# Altium PCB PCB1.PcbDoc
Units mm, origin at the board's own origin, x right, y up, seen from the top; angles counter-clockwise.
Board outline 46.79 x 22.48 mm, 2 copper layers (Top Layer, Bottom Layer); 5 components, 4 nets, 22 pads, 8 vias.
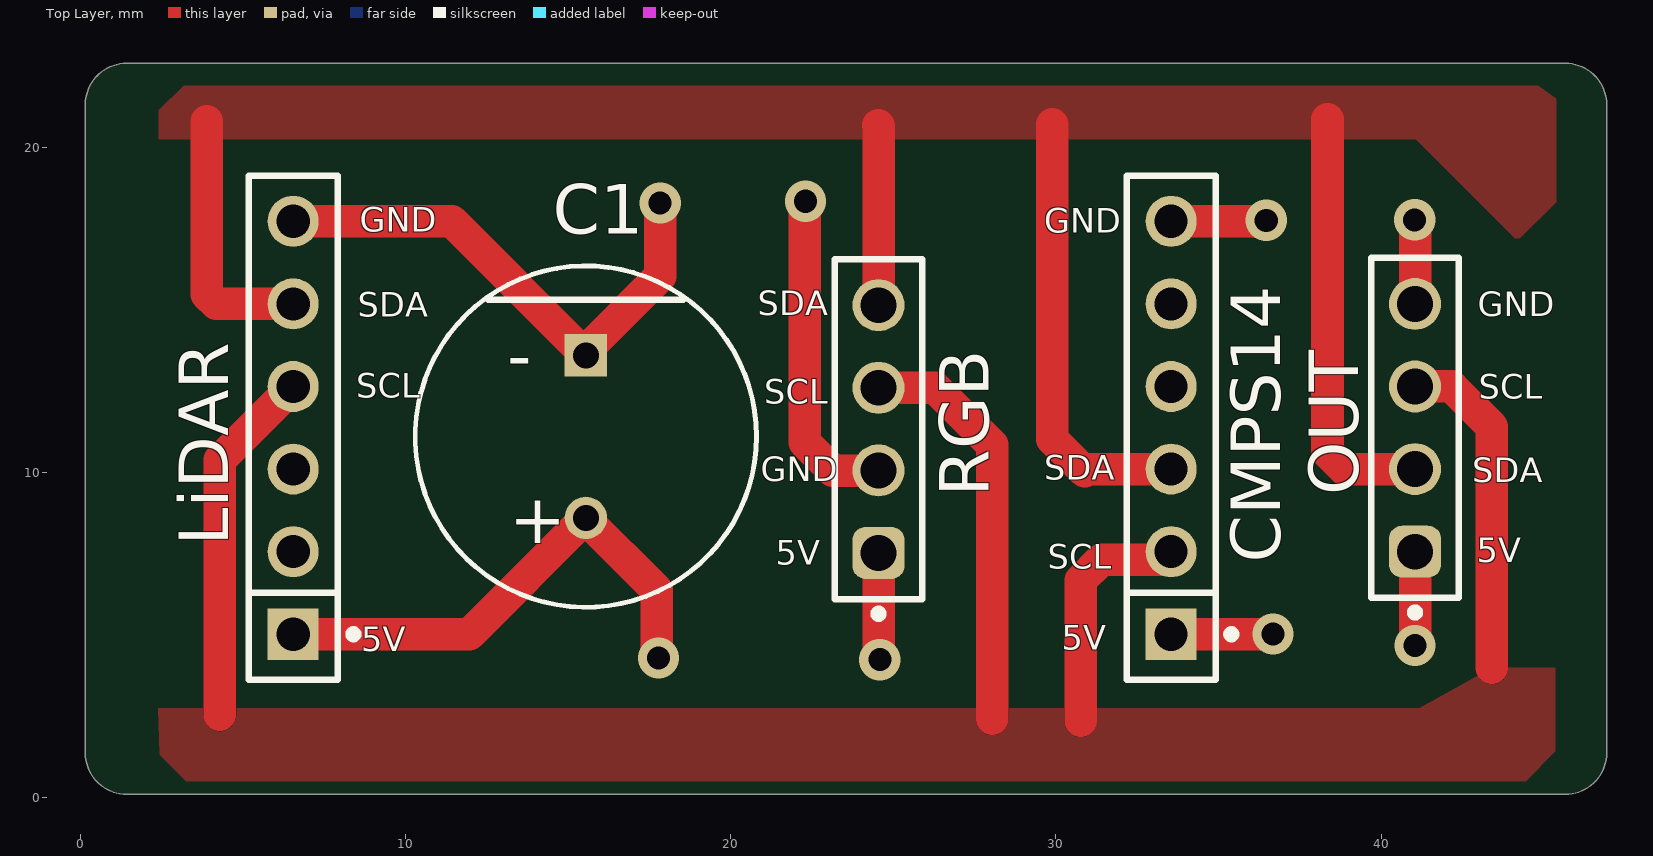
[diagram p0: Top Layer view]
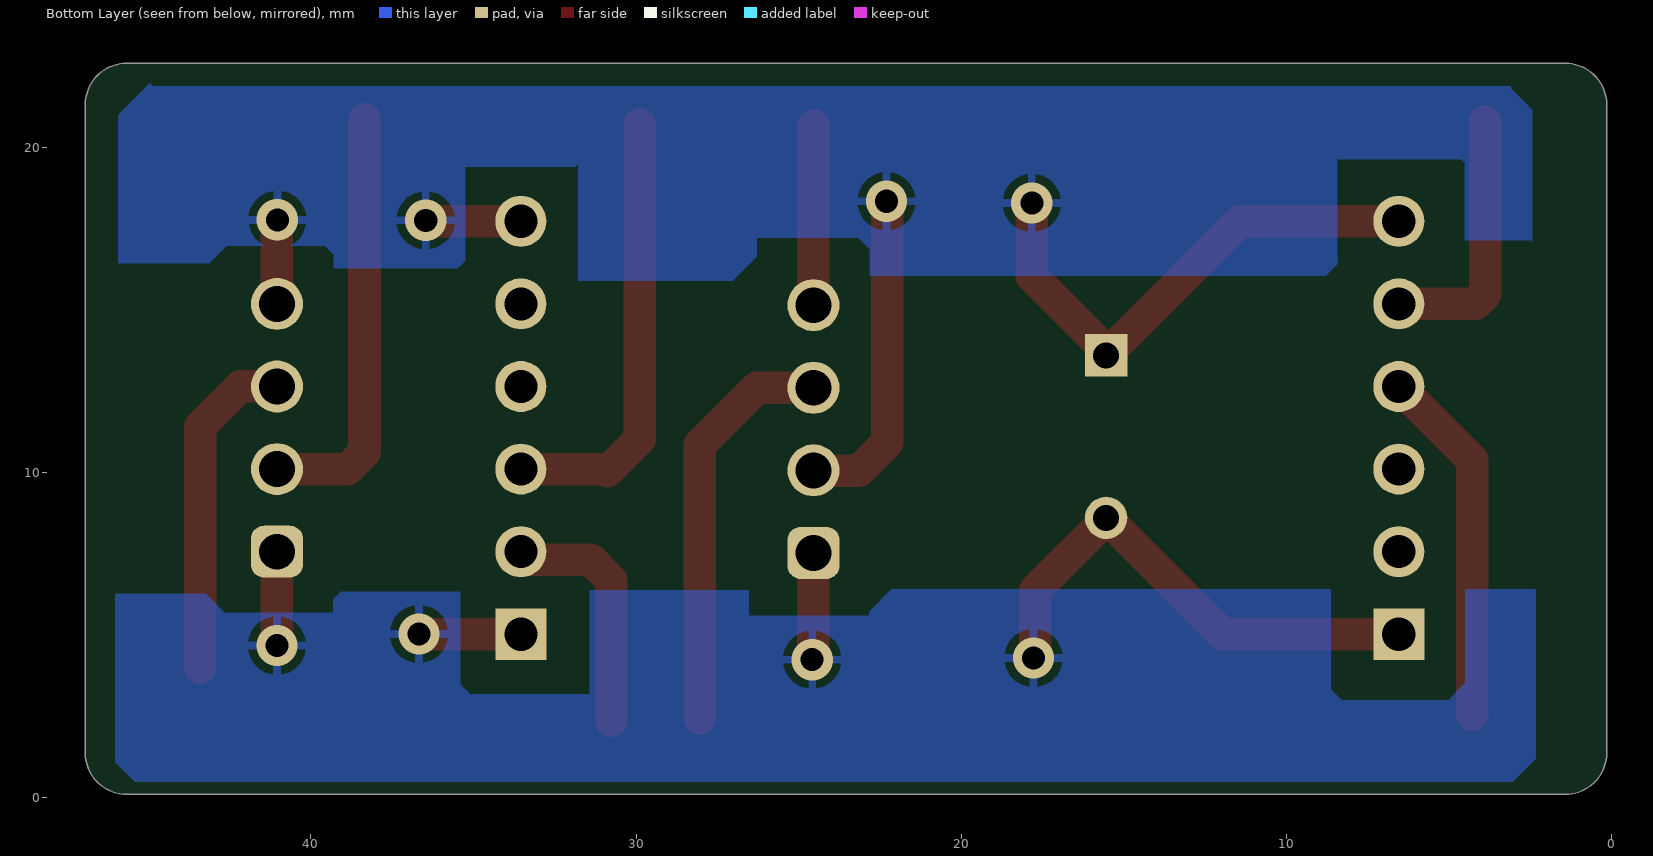
[diagram p1: Bottom Layer view, seen from below]

## Layer stack, top to bottom
Top Solder: solder mask 0.0102, Solder Resist, Dk 3.5
Top Layer: signal copper 0.0356
Dielectric 1: dielectric 0.32, FR-4, Dk 4.8
Bottom Layer: signal copper 0.0356
Bottom Solder: solder mask 0.0102, Solder Resist, Dk 3.5

## Board outline
0.152,1.372 0.152,21.311 cw(c1.422,21.311) 1.422,22.581 45.669,22.581 cw(c45.669,21.311) 46.939,21.311 46.939,1.372 cw(c45.669,1.372) 45.669,0.102 1.422,0.102 cw(c1.422,1.372)

## Design rules (kind name [scope] priority, off if disabled: settings)
Clearance [All] p1 off: gap=0.006 ignorepadtopadclearanceinfootprint=FALSE except(0: Arc-SMDPad Arc-THPad Arc-Hole Track-SMDPad Track-THPad Track-Hole SMDPad-SMDPad SMDPad-THPad SMDPad-Hole THPad-THPad THPad-Hole Via-Hole Fill-Hole Poly-Hole Region-Hole Text-Hole)
PolygonConnect [All] p1: connectstyle=Relief reliefconductorwidth=0.254 reliefentries=4 polygonreliefangle="90 Angle" airgapwidth=0.254
RoutingVias [All] p1: holewidth=0.711 width=1.27 viastyle="Through Hole" minholewidth=0.711 minwidth=1.27 maxholewidth=0.711 maxwidth=1.27
SolderMaskExpansion [All] p1: expansion=0.102 istentingtop=FALSE
SupplyNets "Schematic Supply Nets_1" [InNet('GND')] p1: voltage=0.000
SupplyNets "Schematic Supply Nets" [InNet('+5')] p2: voltage=0.000
Width [All] p1: maxlimit=1 minlimit=0.006 preferedwidth=0.008
30 further rules are at their usual default settings.

## Components (designator, comment, footprint, x,y, rotation, side; value= is the part's Value field where it differs from the comment)
C1 "1000uF" FP-RAD-TH-D_10_0_5-L_16_1-MFG 15.546,11.103 r270 top
CMPS14 "22-28-4060" FP-22-28-4060-MFG 33.546,11.373 r90 top
LiDAR "22-28-4060" FP-22-28-4060-MFG 6.546,11.373 r90 top
OUT "61300411121" 61300411121 41.046,11.373 r90 top
RGB "61300411121" 61300411121 24.546,11.333 r90 top

## Footprints (in the part's own frame and the unit in brackets; to place one, negate y for a bottom-side part, rotate by r counter-clockwise, add the part's x,y. Pads: shape width x height; smd on the part's side, far side on the other; paste and mask are expansions set on the pad)
61300411121 [mm] "Pin Header, pitch 2.54 mm, THT, Vertical, single row, 4p"
  rrect50% 1.6x1.6 hole 1.1: 1(-3.81,0)
  round 1.6 hole 1.1: 2(-1.27,0) 3(1.27,0) 4(3.81,0)
  silkscreen extent -5.8,-1.35 5.23,1.35, body extent -5.08,-1.27 5.08,1.27, height 8.57
FP-22-28-4060-MFG [mm]
  rect 1.57x1.57 hole 1.02 paste-2539.97 mask+0: 1(-6.35,0)
  round 1.57 hole 1.02 paste-2539.97 mask+0: 2(-3.81,0) 3(-1.27,0) 4(1.27,0) 5(3.81,0) 6(6.35,0)
  silkscreen extent -7.75,-1.97 7.75,1.37, body extent -7.85,-1.47 7.85,1.47, height 0.25
FP-RAD-TH-D_10_0_5-L_16_1-MFG [mm]
  rect 1.3x1.3 hole 0.8 paste-2539.97 mask+0: 1(-2.5,0)
  round 1.3 hole 0.8 paste-2539.97 mask+0: 2(2.5,0)
  silkscreen extent -5.25,-5.25 5.25,5.25, body extent -5.35,-5.35 5.35,5.35, height 0.25

## Part data
C1: library part CMP-05427-001524-1, "Aluminum Electrolytic Capacitors (Radial Lead Type) 1000uF ±20% 16V", Capacitance=1mF, Case/Package=Radial, Leakage Current=3uA, Max Operating Temperature=85°C, Min Operating Temperature=-40°C, Package Quantity=200, Ripple Current=680mA, Tolerance=20%, Voltage=16V, Construction=RADIAL, Contact Plating=Tin, Diameter=10mm, Dissipation Factor=0.2%, Height=16mm, Height - Seated (Max)=0.669inch, Lead Diameter=0.6mm, Lead Pitch=5mm, Lead/Base Style=Straight, Length=16mm, Life (Hours)=2000Hour, Mount="Through Hole", Number of Pins=2, Packaging=Bulk, Polarity=Polar, Radiation Hardening=No, REACH SVHC="No SVHC", Ripple Current (AC)=680mA, RoHS Compliant=Yes, Series=M, Size=16mm, Termination=Radial, Voltage Rating=16V, Voltage Rating (DC)=16V, Width=0inch
CMPS14 LiDAR: library part CMP-04776-000763-1, "CONN HEADER VERT 6POS 2.54MM", Color=Black, Contact Resistance=20mR, Current Rating=4A, Max Operating Temperature=75°C, Max Voltage Rating (AC)=250V, Max Voltage Rating (DC)=250.25kV, Min Operating Temperature=0°C, Package Quantity=1, Connector Type="Male Pin", Contact Material=Brass, Contact Mating Length=0.24inch, Contact Plating=Tin, Contact Type="Male Pin", Depth=2.49mm, Gender=Male, Housing Color=Black, Housing Material=Thermoplastic, Length=15.24mm, Mount="Through Hole", Number of Contacts=6, Number of Positions=6, Number of Rows=1, Orientation=Straight, Packaging=Bulk, Pitch=2.54mm, RoHS Compliant=Yes, Series="KK® 42375", Termination=Solder, Voltage Rating=250V
OUT RGB: library part CMP-1502-01064-3, Color=Black, Contact Resistance=20mΩ, Current Rating=3A, Max Operating Temperature=105°C, Min Operating Temperature=-40°C, Operating Supply Voltage=250V, Connector Type="Male Pin", Contact Material=Copper, Contact Mating Length=5.9944mm, Contact Plating=Gold, Gender=Male, Height=8.89mm, Lead Free="Lead Free", Lead Pitch=2.54mm, Mount="Through Hole", NexarPartId=32855522, Number of Contacts=4, Number of Pins=4, Number of Positions=4, Number of Rows=1, Orientation=Vertical, Packaging=Bulk, Pitch=2.54mm, REACH SVHC=Unknown, RoHS=Compliant, Termination=Solder, Voltage Rating=250V

## Via types
v1: diameter 1.27, hole 0.711, Top Layer to Bottom Layer, 8 vias

## Nets (pads, with @x,y where several pads share a name; then routed paths per layer and width w, separated by ;. In a path a pad name is that pad's centre, name@x,y a point inside that pad or via, vN(x,y) a via of type N, cw(c..) or ccw(c..) an arc to the next point about the centre after c; other vN are vias at no path point)
+5: C1.2 | length 21.9
  Top Layer w1: 6.546,5.023 11.966,5.023 15.525,8.582 17.728,6.378 17.728,4.344 v1(17.78,4.293) ; 24.546,7.523 24.546,4.283 v1(24.587,4.242) ; v1(41.046,4.674) 41.046,7.563
  other v1: 36.678,5.029
GND: C1.1 | length 32.1
  Top Layer w1: 6.546,17.723 11.426,17.723 15.474,13.675 17.831,16.032 v1(17.831,18.288) ; v1(22.301,18.339) 22.276,18.313 22.276,10.922 23.139,10.058 24.765,10.058 ; 33.546,17.723 36.443,17.723 v1(36.471,17.751) v1@36.5,17.78 ; v1@41.021,17.78 41.046,17.755 41.046,15.183
  other v1: 41.033,17.768
NetCMPS14_SCL:  | length 41.4
  Top Layer w1: 4.293,2.54 4.293,10.39 6.546,12.643 ; 24.546,12.603 26.285,12.603 28.042,10.846 28.042,2.425 ; 30.759,2.362 30.759,6.68 31.394,7.315 33.298,7.315 33.546,7.563 ; 41.046,12.643 42.17,12.643 43.409,11.405 43.409,3.988
NetCMPS14_SDA:  | length 40.6
  Top Layer w1: 3.886,20.803 3.886,15.481 4.185,15.183 6.546,15.183 ; 24.536,20.676 24.546,20.666 24.546,15.143 ; 29.896,20.701 29.896,11.015 30.882,10.029 30.956,10.103 33.546,10.103 ; 38.354,20.853 38.354,10.617 38.583,10.389 38.868,10.103 41.046,10.103
pads on no net: CMPS14.1 CMPS14.2 CMPS14.3 CMPS14.4 CMPS14.5 CMPS14.6 LiDAR.1 LiDAR.2 LiDAR.3 LiDAR.4 LiDAR.5 LiDAR.6 OUT.1 OUT.2 OUT.3 OUT.4 RGB.1 RGB.2 RGB.3 RGB.4
copper on no net: | length 3.2
  Top Layer w0.051: 36.671,5.023 36.678,5.029 ; 41.046,4.674 41.072,4.648
  Top Layer w1: 33.546,5.023 36.671,5.023

## Polygon pours and split planes (outlines as drawn)
NetCMPS14_SCL on Top Layer "NETCMPS14_SCL_L01_P000" (solid, pour order 0): 2.388,2.743 41.173,2.743 43.409,3.988 45.364,3.988 45.364,1.422 44.45,0.508 3.251,0.508 2.438,1.321
NetCMPS14_SDA on Top Layer "NETCMPS14_SDA_L01_P004" (solid, pour order 4): 2.413,20.244 41.072,20.244 44.12,17.196 44.272,17.196 45.39,18.313 45.39,21.488 44.831,21.895 44.602,21.895 3.175,21.895 2.413,21.133
+5 on Bottom Layer "+5_L02_P007" (solid, pour order 7): 2.337,6.375 2.362,6.401 4.496,6.401 4.496,3.531 5.029,2.997 8.306,2.997 8.636,3.327 8.636,6.401 22.149,6.401 22.835,5.715 22.835,5.588 26.543,5.588 26.543,6.375 31.42,6.375 31.42,3.175 35.052,3.175 35.077,3.15 35.408,3.48 35.408,6.325 39.091,6.325 39.319,6.096 39.319,5.69 42.647,5.69 43.231,6.274 46.025,6.274 46.025,1.092 45.415,0.483 3.048,0.483 2.337,1.194
GND on Bottom Layer "GND_L02_P008" (solid, pour order 8): 2.438,17.094 2.489,17.145 4.521,17.145 4.521,19.482 4.496,19.507 4.623,19.634 8.433,19.634 8.433,16.459 8.407,16.434 8.788,16.053 22.809,16.053 22.809,16.866 23.165,17.221 26.289,17.221 26.289,16.637 27.026,15.9 31.775,15.9 31.775,19.456 31.801,19.482 31.877,19.406 35.255,19.406 35.255,16.51 35.484,16.281 39.294,16.281 39.294,16.688 39.599,16.993 39.624,16.967 42.596,16.967 43.129,16.434 45.923,16.434 45.923,21.006 44.958,21.971 44.856,21.869 3.099,21.869 3.099,21.819 2.438,21.158

## Silkscreen, mask and mechanical layers (free items; w line width, h text height)
Top Overlay:
  text "GND" at 8.585,17.399 h0.75
  text "GND" at 29.642,17.374 h0.75
  text "SDA" at 20.828,14.834 h0.75
  text "GND" at 42.977,14.808 h0.75
  text "SDA" at 8.534,14.783 h0.75
  text "-" at 13.132,12.853 h1.52
  text "SCL" at 8.484,12.294 h0.75
  text "SCL" at 43.002,12.268 h0.75
  text "SCL" at 21.031,12.116 h0.75
  text "SDA" at 29.642,9.779 h0.75
  text "GND" at 20.93,9.728 h0.75
  text "SDA" at 42.799,9.703 h0.75
  text "+" at 13.183,7.823 h1.52
  text "5V" at 42.951,7.239 h0.75
  text "5V" at 21.387,7.163 h0.75
  text "SCL" at 29.743,7.036 h0.75
  text "5V" at 30.175,4.547 h0.75
  text "5V" at 8.636,4.496 h0.75
Mechanical 1:
  lines w0.254: 0.152,1.372 ccw(c1.422,1.372) 1.422,0.102 4.851,0.102 45.669,0.102 ccw(c45.669,1.372) 46.939,1.372 46.939,21.311 ccw(c45.669,21.311) 45.669,22.581 1.422,22.581 ccw(c1.422,21.311) 0.152,21.311 0.152,1.372